# Altium PCB Karta_ILS.PCBDOC (part 8 of 9)
Units mm, origin at the board's own origin, x right, y up, seen from the top; angles counter-clockwise.
Board outline 70 x 83.2 mm, 6 copper layers (TopLayer, Layer 1, Layer 2, Layer 3, Layer 4, Bottom Layer), stack 0.914 mm thick; 406 components, 271 nets, 1327 pads, 719 vias.
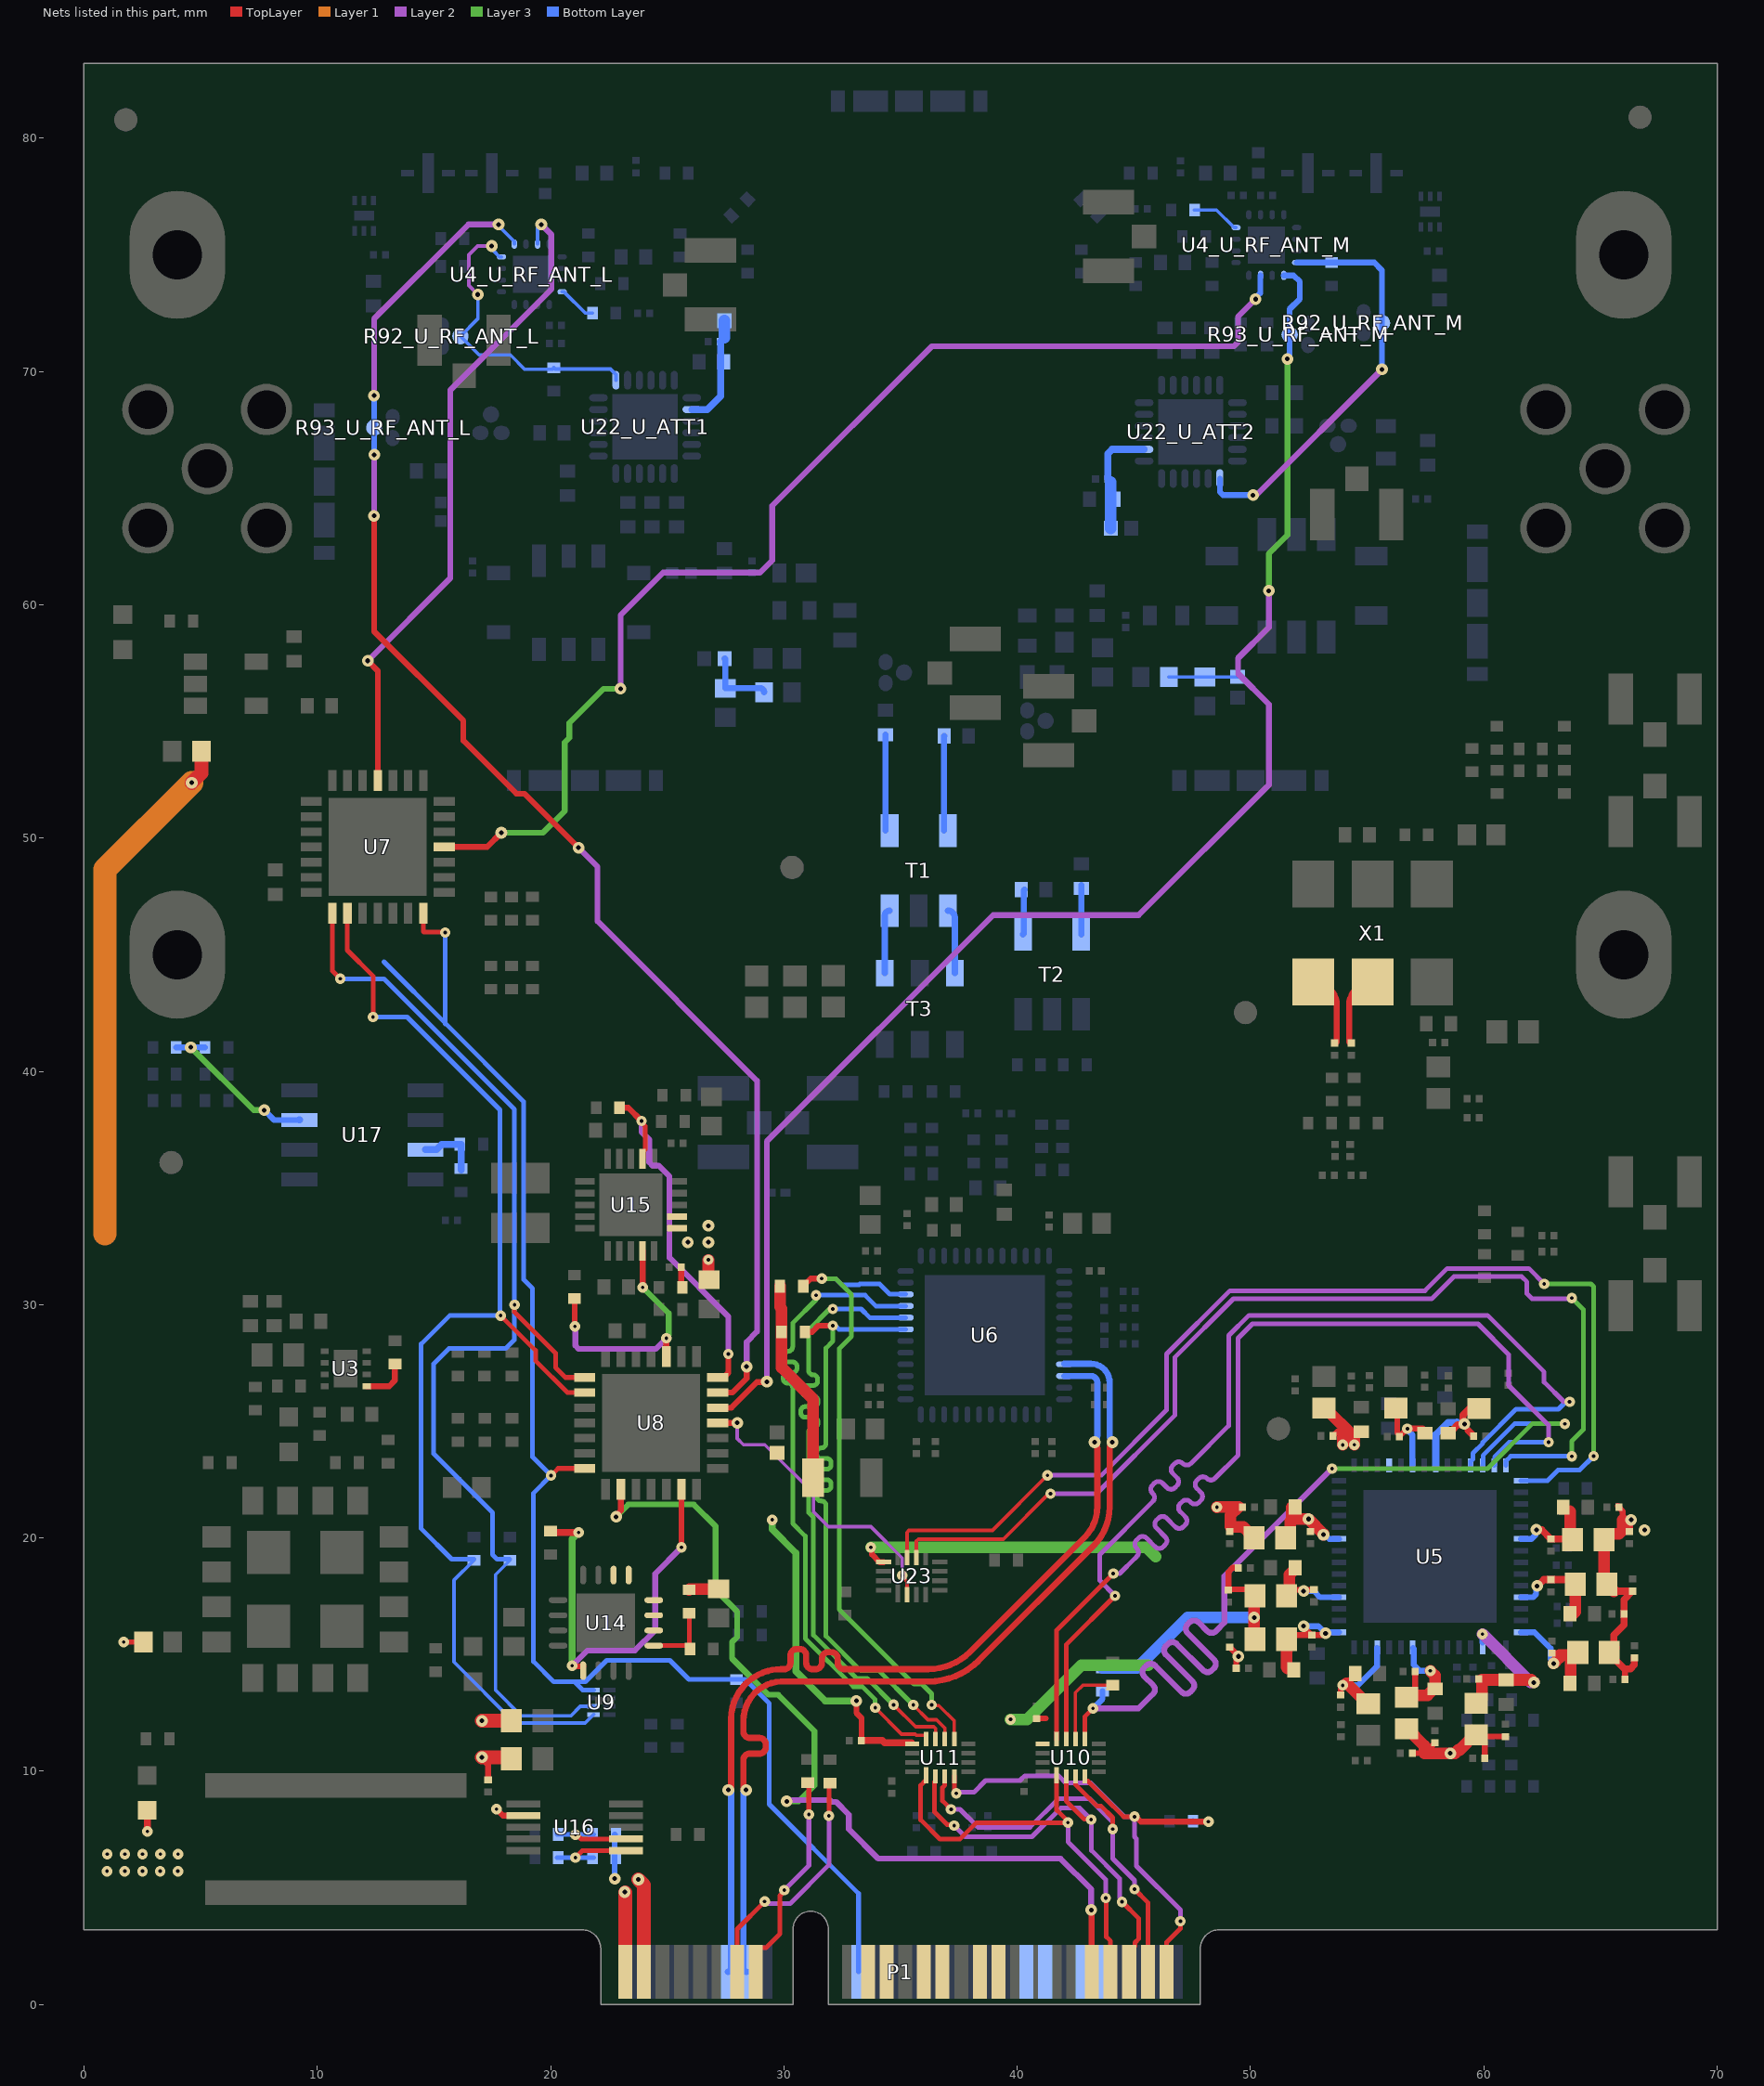
[diagram p9: the nets of this part, all layers, seen from the top]

## Via types
v1: diameter 0.5, hole 0.2, TopLayer to Bottom Layer, tented both sides, 456 vias
v2: diameter 0.45, hole 0.15, TopLayer to Bottom Layer, tented both sides, 237 vias
v3: diameter 0.45, hole 0.15, TopLayer to Bottom Layer, 23 vias
v4: diameter 0.5, hole 0.2, TopLayer to Bottom Layer, 3 vias

## Nets (pads, with @x,y where several pads share a name; then routed paths per layer and width w, separated by ;. In a path a pad name is that pad's centre, name@x,y a point inside that pad or via, vN(x,y) a via of type N, cw(c..) or ccw(c..) an arc to the next point about the centre after c; other vN are vias at no path point) (continued)
NetR90_U_RF_ANT_L_2: R90_U_RF_ANT_L.2 U4_U_RF_ANT_L.4 | length 1.7
  Bottom Layer w0.15: U4_U_RF_ANT_L.4@20.494,73.414 20.579,73.414 21.493,72.5 R90_U_RF_ANT_L.2@21.794,72.5
NetR90_U_RF_ANT_M_2: R90_U_RF_ANT_M.2 U4_U_RF_ANT_M.4 | length 2.1
  Bottom Layer w0.15: R90_U_RF_ANT_M.2@47.6,76.919 48.543,76.919 49.293,76.169 U4_U_RF_ANT_M.4@49.378,76.169
NetR98_1: R98.1 R99.2 U14.9 | length 3.1
  TopLayer w0.2: U14.9@24.423,15.384 R99.2@25.883,15.384 ; R98.1@25.942,16.826 25.942,15.325 R99.2@26.025,15.242
NetR108_1: R108.1 R110.2 U16.2 | length 3.8
  TopLayer w0.2: v2(21.064,7.285) 21.118,7.285 21.309,7.094 U16.2@23.227,7.094
  Bottom Layer w0.2: R110.2@20.275,7.285 v2(21.064,7.285) R108.1@21.853,7.285
NetR109_1: R109.1 R111.2 U16.1 | length 3.9
  TopLayer w0.2: v2(21.062,6.294) 21.362,6.594 U16.1@23.227,6.594
  Bottom Layer w0.2: R111.2@20.28,6.294 v2(21.062,6.294) R109.1@21.844,6.294
NetR112_1: R112.1 R115.2 U17.7 | length 2.7
  Bottom Layer w0.3: U17.7@14.637,36.644 15.112,36.644 15.34,36.872 16.161,36.872 R112.1@16.161,35.78
NetR113_1: R113.1 R114.2 U17.3 | length 7.2
  Layer 3 w0.25: v1(4.579,41.029) 7.274,38.335 v1(7.729,38.335)
  Bottom Layer w0.25: R114.2@3.954,41.029 v1(4.579,41.029) R113.1@5.19,41.029 ; v1(7.729,38.335) 8.15,37.914 U17.3@9.237,37.914
  Bottom Layer w0.3: U17.3@9.228,37.922 U17.3@9.237,37.914
NetR123_2: R123.2 U3.5 | length 2
  TopLayer w0.25: U3.5@12.116,26.507 13.081,26.507 13.326,26.752 R123.2@13.326,27.452
NetT1_1: T1.1 T3.6 | length 2.8
  Bottom Layer w0.268: T3.6@34.327,44.208 34.327,46.683 cw(c34.533,46.683) T1.1@34.533,46.888
NetT1_3: T1.3 T3.4 | length 2.8
  Bottom Layer w0.268: T1.3@37.033,46.888 cw(c37.033,46.594) 37.327,46.594 T3.4@37.327,44.208
PER0_N: P1.21
PER0_P: P1.19
PER1_N: P1.27
PER1_P: P1.25
PER2_N: P1.33
PER2_P: P1.31
PERST2#: P1.43 U8.16 | length 39.5
  TopLayer w0.25: v1(22.809,20.906) 22.809,20.974 23.01,21.175 U8.16@23.01,22.079 ; v1(43.17,4.054) 43.185,4.039 43.185,1.415 P1.43@43.2,1.4
  Layer 2 w0.25: v1(30.124,8.712) 30.171,8.759 31.975,8.759 32.051,8.684 32.24,8.684 32.785,8.139 32.785,7.515 34.046,6.254 41.863,6.254 43.17,4.946 v1(43.17,4.054)
  Layer 3 w0.25: v1(22.809,20.906) 23.337,21.434 26.144,21.434 27.075,20.502 27.075,17.766 28,16.841 28,15.761 27.777,15.538 27.777,14.833 29.333,13.277 29.756,13.277 31.311,11.721 31.311,9.39 30.792,8.87 30.634,8.712 v1(30.124,8.712)
PERST#: P1.18 R1.2 U7.14 U8.14 U9.8 | length 66.1
  TopLayer w0.2: U7.14@14.552,46.735 14.552,45.985 14.569,45.969 15.461,45.969 v2(15.481,45.949) ; v2(20.022,22.676) 20.326,22.979 U8.14@21.46,22.979
  Bottom Layer w0.2: 12.854,44.697 15.496,42.055 18.849,38.702 18.849,31.076 19.227,30.698 19.227,23.472 v2(20.022,22.676) 19.27,21.923 19.27,17.637 19.27,14.699 20.133,13.836 21.027,13.836 ; 15.481,42.04 v2(15.481,45.949) ; U9.8@21.844,13.481 21.381,13.481 21.027,13.836 ; P1.18@33.2,1.4 33.2,4.757 29.372,8.585 29.372,12.91 28.346,13.935 27.966,13.935 25.93,13.935 25.109,14.756 22.41,14.756 21.49,13.836 21.027,13.836
PET2_N: P1.38
PET2_P: P1.36
PET3_N: P1.44
PET3_P: P1.42
PG_LMK_1V8: R105.1 U8.3 U15.9 | length 11.2
  TopLayer w0.25: R105.1@21.033,30.253 21.033,29.078 v2(21.044,29.068) ; U15.9@23.945,32.304 23.949,32.301 23.949,30.744 v2(23.952,30.74) ; U8.3@24.96,27.779 v2(24.96,28.559)
  Layer 2 w0.25: v2(21.044,29.068) 21.059,29.052 21.059,28.246 21.206,28.099 24.501,28.099 v2(24.96,28.559)
  Layer 3 w0.25: v2(23.952,30.74) 25.06,29.632 25.06,28.713 24.96,28.613 v2(24.96,28.559)
PG_LMK_3V3: R104.1 U8.28 U15.17 | length 15.9
  TopLayer w0.2: v2(23.898,37.874) 23.898,37.806 24.059,37.645 24.059,36.786 24.051,36.779 24.051,36.645 23.985,36.579 23.985,36.294 U15.17@23.945,36.254
  TopLayer w0.25: R104.1@22.96,38.442 23.33,38.442 v2(23.898,37.874) ; U8.28@27.16,26.879 27.425,26.879 27.62,27.074 v2(27.62,27.883)
  Layer 2 w0.25: v2(23.898,37.874) 23.898,37.401 24.224,37.075 24.224,36.106 24.371,35.959 24.637,35.959 25.096,35.5 25.096,32.009 27.62,29.485 v2(27.62,27.883)
PG_LTC2122: R97.1 U8.20 U14.5 | length 18.2
  TopLayer w0.25: v2(20.923,14.52) 20.952,14.492 U14.5@21.398,14.492 ; v2(25.61,19.594) U8.20@25.61,22.079
  TopLayer w0.3: R97.1@19.993,20.291 20.047,20.237 21.201,20.237 v2(21.205,20.233)
  Layer 2 w0.25: v2(20.923,14.52) 21.576,15.174 23.613,15.174 24.481,16.042 24.481,18.465 v2(25.61,19.594)
  Layer 3 w0.3: v2(20.923,14.52) 20.923,19.951 v2(21.205,20.233)
PGND: C1.1 C3.1 C153.1 D11.2 FB30.1 FB31.1 P1.1 P1.3 R108.2 R109.2 U16.7 | length 38.5
  TopLayer w0.2: v2(1.702,15.538) C1.1@2.55,15.538 C1.1@2.606,15.538
  TopLayer w0.25: v1(17.061,10.597) 17.061,10.529 17.323,10.267 C153.1@17.323,9.627 ; v2(17.681,8.375) 17.961,8.094 U16.7@18.827,8.094
  TopLayer w0.3: v2(2.715,7.421) D11.2@2.715,8.325 ; P1.3@24.072,1.4 P1.3@24.086,1.414
  TopLayer w0.5: v1(23.18,4.823) v1@23.2,4.803
  TopLayer w0.6: v1(4.619,52.368) 5.033,52.782 C3.1@5.033,53.721 ; v1(17.061,10.597) 18.264,10.597 FB30.1@18.325,10.536 ; v1(17.061,12.164) 17.064,12.167 FB31.1@18.325,12.167 ; P1.1@23.2,1.4 v1@23.2,4.803 ; v1(23.764,5.361) 24,5.125 P1.3@24,1.4
  Layer 1 w1: 0.9,33.041 0.9,48.649 v1(4.619,52.368)
  Bottom Layer w0.25: v1(22.753,5.397) 22.749,5.401 22.749,6.29 22.744,6.294 22.749,6.299 22.749,7.28 R108.2@22.753,7.285
  other v2: 0.991,5.715 1.75,5.715 2.508,5.715 3.267,5.715 4.026,5.715 0.996,6.444 1.755,6.444 2.513,6.444 3.272,6.444 4.031,6.444
Q\_U_RF_ANT_L: R91_U_ATT1.1 R92_U_RF_ANT_L.3 U4_U_RF_ANT_L.12 U22_U_ATT1.19 | length 13.4
  Layer 2 w0.15: v1(16.881,73.299) 16.496,73.683 16.496,75 16.875,75.379 v1(17.481,75.379)
  Bottom Layer w0.15: v1(16.881,73.299) 16.881,72.254 R92_U_RF_ANT_L.3@16.137,71.511 16.937,70.711 18.276,70.711 18.896,70.091 20.067,70.091 R91_U_ATT1.1@20.136,70.161 20.195,70.101 22.572,70.101 22.802,69.871 U22_U_ATT1.19@22.802,69.621 ; v1(17.481,75.379) 17.548,75.312 17.548,75.175 17.809,74.914 U4_U_RF_ANT_L.12@17.894,74.914
Q\_U_RF_ANT_M: R91_U_ATT2.1 R92_U_RF_ANT_M.3 U4_U_RF_ANT_M.12 U22_U_ATT2.19 | length 17.9
  Layer 2 w0.25: v1(50.109,64.702) 50.248,64.702 v1(55.633,70.087)
  Bottom Layer w0.25: U22_U_ATT2.19@48.688,65.412 48.688,64.835 48.821,64.702 v1(50.109,64.702) ; U4_U_RF_ANT_M.12@51.978,74.669 R91_U_ATT2.1@53.478,74.669 55.307,74.669 55.636,74.34 R92_U_RF_ANT_M.3@55.636,72.088 55.633,72.086 v1(55.633,70.087)
Q_U_RF_ANT_L: R93_U_RF_ANT_L.3 U4_U_RF_ANT_L.13 U8.27 | length 62.2
  TopLayer w0.25: v1(12.437,63.81) 12.437,58.851 16.262,55.026 16.262,54.171 18.531,51.902 18.883,51.902 v1(21.2,49.585) ; U8.27@27.16,26.229 27.785,26.229 28.401,26.845 v1(28.401,27.341)
  Layer 2 w0.25: v1(12.437,63.81) 12.439,63.812 12.439,66.429 v1(12.441,66.431) ; v1(12.437,68.968) 12.437,72.256 16.481,76.3 v1(17.769,76.3) ; v1(21.2,49.585) 22.011,48.774 22.011,46.439 28.85,39.601 28.85,28.848 28.401,28.399 v1(28.401,27.341)
  Bottom Layer w0.15: v1(17.769,76.3) 17.769,76.245 18.444,75.57 U4_U_RF_ANT_L.13@18.444,75.464
  Bottom Layer w0.25: v1(12.437,68.968) 12.439,68.966 12.439,67.596 R93_U_RF_ANT_L.3@12.441,67.593 v1(12.441,66.431)
Q_U_RF_ANT_M: R93_U_RF_ANT_M.3 U4_U_RF_ANT_M.13 U8.26 | length 64.7
  TopLayer w0.25: U8.26@27.16,25.579 27.745,25.579 28.845,26.679 29.249,26.679 v1(29.27,26.699)
  Layer 2 w0.25: v1(29.27,26.699) 29.27,37 38.97,46.7 45.206,46.7 50.784,52.278 50.784,55.735 49.465,57.054 49.465,57.71 50.784,59.029 v1(50.784,60.6)
  Layer 3 w0.25: v1(50.784,60.6) 50.784,62.188 51.583,62.987 v1(51.583,70.538)
  Bottom Layer w0.25: U4_U_RF_ANT_M.13@51.428,74.119 51.846,74.119 52.115,73.85 52.115,73.11 51.676,72.671 R93_U_RF_ANT_M.3@51.676,71.588 51.676,70.699 51.583,70.606 v1(51.583,70.538)
ResetN_1V8: U5.15 U23.11 | length 47.7
  TopLayer w0.15: U23.11@35.277,19.164 35.277,20.233 35.365,20.321 38.935,20.321 v2(41.3,22.685)
  Layer 2 w0.2: v2(41.3,22.685) 43.609,22.685 46.406,25.482 46.406,27.883 49.121,30.598 57.478,30.598 58.431,31.552 61.927,31.552 v2(62.586,30.892)
  Layer 3 w0.2: v2(62.586,30.892) 64.587,30.892 64.704,30.775 v2(64.704,23.506)
  Bottom Layer w0.2: U5.15@61.593,22.456 62.732,22.456 63.182,22.906 64.104,22.906 v2(64.704,23.506)
ResetN_3V3: U8.25 U23.2 | length 12.8
  TopLayer w0.15: v2(35.07,18.392) 35.07,18.339 35.277,18.132 U23.2@35.277,17.564
  TopLayer w0.25: U8.25@27.16,24.929 v1@28,24.93
  Layer 2 w0.15: v1(28,24.93) 28,24.26 28.264,23.996 29.182,23.996 31.267,21.91 31.267,21.124 31.908,20.484 33.725,20.484 35.07,19.139 v2(35.07,18.392)
RST_RF_P_1: U4_U_RF_ANT_L.15 U7.25 | length 28.3
  TopLayer w0.25: v1(12.165,57.6) 12.594,57.172 U7.25@12.594,52.47
  Layer 2 w0.25: v1(12.165,57.6) 15.7,61.135 15.7,69.2 20.025,73.525 20.025,75.875 v1(19.6,76.3)
  Bottom Layer w0.15: U4_U_RF_ANT_L.15@19.444,75.464 19.444,76.144 v1(19.6,76.3)
RST_RF_P_2: U4_U_RF_ANT_M.15 U7.18 | length 51.6
  TopLayer w0.25: U7.18@15.443,49.62 17.282,49.62 v1(17.889,50.227)
  Layer 2 w0.25: v1(23,56.4) 23,59.555 24.821,61.376 28.976,61.376 29.5,61.9 29.5,64.243 36.335,71.078 49.285,71.078 49.463,71.256 49.463,72.35 v1(50.213,73.1)
  Layer 3 w0.25: v1(17.889,50.227) 19.674,50.227 20.607,51.16 20.607,54.094 20.81,54.297 20.81,54.932 22.277,56.4 v1(23,56.4)
  Bottom Layer w0.25: v1(50.213,73.1) 50.213,73.148 50.418,73.353 50.418,74.109 U4_U_RF_ANT_M.15@50.428,74.119
SCK: R11.2 U7.8 U8.8 U9.6 | length 52.1
  TopLayer w0.2: U7.8@10.644,46.77 10.644,44.307 v2(10.983,43.967) ; v2(18.456,29.99) 18.456,29.674 20.209,27.921 20.209,27.306 20.635,26.879 U8.8@21.46,26.879
  Bottom Layer w0.15: R11.2@18.257,19.089 R11.2@18.257,19.039 17.642,18.423 17.642,13.473 18.744,12.371 20.865,12.371 21.276,12.781 U9.6@21.844,12.781
  Bottom Layer w0.2: v2(10.983,43.967) 12.852,43.967 18.446,38.374 18.446,28.491 18.069,28.115 15.638,28.115 14.991,27.468 14.991,23.605 17.511,21.085 17.511,19.284 17.706,19.089 R11.2@18.257,19.089
SDA: R10.2 U7.9 U8.9 U9.5 | length 52.6
  TopLayer w0.2: U7.9@11.294,46.77 11.29,46.766 11.29,45.542 11.286,45.538 11.286,45.194 12.391,44.089 v2(12.391,42.331) ; v2(17.861,29.531) 19.357,28.035 19.357,27.592 20.72,26.229 U8.9@21.46,26.229
  Bottom Layer w0.15: R10.2@16.711,19.089 R10.2@16.711,19.039 15.861,18.189 15.861,14.683 18.473,12.071 21.483,12.071 U9.5@21.844,12.431
  Bottom Layer w0.2: v2(12.391,42.331) 13.855,42.331 17.833,38.353 17.833,29.559 v2(17.861,29.531) 15.675,29.531 14.456,28.312 14.456,20.394 15.762,19.089 R10.2@16.711,19.089
SMCLK: P1.15 R71.1 | length 9.3
  TopLayer w0.2: P1.15@28.8,1.4 28.8,2.237 29,2.437 29.237,2.437 29.828,3.027 29.828,4.662 30.021,4.856 v2(30.021,4.904) ; R71.1@31.025,9.554 31.072,9.507 v3(31.072,8.149)
  Layer 2 w0.2: v2(30.021,4.904) 31.072,5.955 v3(31.072,8.149)
SMDAT: P1.13 R70.1 | length 10.5
  TopLayer w0.2: P1.13@28,1.4 28,3.236 v2(29.177,4.412) ; v3(31.924,8.087) 31.924,8.099 31.928,8.103 R70.1@31.928,9.48
  Layer 2 w0.2: v2(29.177,4.412) 29.27,4.319 30.263,4.319 31.928,5.984 31.928,8.083 v3(31.924,8.087)
SPI_1V8_ADC: C15.1 C75.2 FB6.1 FB7.1 R14.2 R15.2 R98.2 U11.13 U14.10 U14.11 U14.12 U14.13 U14.14 | length 24.1
  TopLayer w0.25: v1(33.109,13.017) 33.109,12.504 33.327,12.286 33.327,11.321 C15.1@33.327,11.319
  TopLayer w0.3: C15.1@33.327,11.321 34.206,11.321 34.309,11.218 U11.13@35.461,11.218
  TopLayer w0.5: R98.2@25.942,17.776 25.964,17.798 27.181,17.798 C75.2@27.203,17.821 ; R15.2@29.831,30.789 29.831,29.9 29.899,29.832 R14.2@29.899,28.832 29.899,27.3 31.25,25.949 FB7.1@31.25,22.585
  Layer 3 w0.3: v3@29.5,20.808 29.5,20.364 30.516,19.348 30.516,14.279 31.778,13.017 v1(33.109,13.017)
  other v3: 29.499,20.777
SPI_1V8_CLK: C71.1 C113.2 C114.2 C117.2 C118.2 C121.2 C122.2 C125.2 C126.2 C131.2 C132.2 C135.2 C136.2 C141.2 C142.2 C143.2 C144.2 C147.2 C148.2 FB13.1 FB14.1 FB16.1 FB17.1 FB18.1 FB19.1 FB20.1 FB21.1 R12.2 R102.2 U10.13 U15.11 U15.12 U23.13 | length 56.7
  TopLayer w0.25: R102.2@25.596,30.74 25.601,30.745 25.601,31.591 C142.2@25.606,31.596 ; v2(33.732,19.594) 33.77,19.556 33.77,19.296 34.102,18.964 U23.13@34.277,18.964 ; C71.1@40.84,12.264 41.23,12.264 ; C125.2@49.053,17.77 49.053,18.543 49.227,18.718 C126.2@49.479,18.718 ; C118.2@49.099,15.316 49.109,15.316 49.485,14.94 v1(49.485,14.921) ; C125.2@49.14,17.796 49.915,17.796 FB17.1@50.197,17.514 ; C117.2@49.387,14.414 49.387,14.733 49.495,14.841 v1@49.495,14.93 ; C148.2@56.944,10.769 57.453,10.769 C147.2@57.909,11.225 ; FB13.1@59.798,11.488 C113.2@60.93,11.488 ; FB13.1@59.799,11.479 60.037,11.24 C114.2@60.037,10.557 ; C121.2@65.739,21.367 C121.2@65.849,21.257 ; C121.2@65.823,21.275 65.955,21.143 65.955,20.777 ; 66.033,14.384 66.048,14.369 C144.2@66.048,13.932 ; C122.2@66.24,20.269 66.265,20.294 66.265,20.729 v1(66.313,20.777)
  TopLayer w0.3: FB20.1@65.379,15.038 66.033,14.384 66.281,14.384 66.457,14.56 C143.2@66.457,14.853 ; FB18.1@65.571,17.717 C132.2@66.373,17.717 66.009,17.354 C131.2@66.009,16.751 66.009,16.271 65.579,15.841 FB20.1@65.579,15.288
  TopLayer w0.5: v3(26.764,31.921) 26.764,31.089 C141.2@26.788,31.065 ; v2(48.561,21.319) 48.563,21.321 49.486,21.321 49.137,20.972 49.137,20.494 49.159,20.472 49.687,20.472 49.9,20.259 49.95,20.259 50.15,20.059 FB19.1@50.15,20.009 ; FB14.1@50.197,15.657 50.161,15.693 v1(50.161,16.586) 50.161,17.478 FB17.1@50.197,17.514 ; FB21.1@56.684,11.817 56.734,11.817 57.453,11.098 57.453,10.769 58.765,10.769 58.907,10.912 58.967,10.912 59.621,11.565 FB13.1@59.671,11.565 ; FB20.1@65.379,15.038 FB20.1@65.379,15.088 FB20.1@65.579,15.288 ; FB18.1@65.571,17.717 65.524,17.764 65.474,17.764 65.274,17.964 FB18.1@65.274,18.014 65.156,18.132 FB16.1@65.156,19.928 65.156,19.978 65.356,20.178 65.794,20.178 65.955,20.34 65.955,20.777
  Layer 3 w0.5: v2(33.732,19.594) 45.543,19.594 45.931,19.206 ; v3(39.717,12.222) 40.425,12.222 42.754,14.55 45.61,14.55 45.615,14.545
  Bottom Layer w0.5: R12.2@43.658,14.429 45.143,14.429 47.3,16.586 v1(50.161,16.586)
  other v1: 58.561,10.769 66.89,20.338 25.883,32.673 26.764,32.673 26.764,33.382
SPI_CLK_LMK: U5.13 U10.12 | length 44.8
  TopLayer w0.2: U10.12@41.695,11.379 41.695,16.048 v3(44.119,18.471)
  Layer 2 w0.2: v3(44.119,18.471) 44.394,18.471 45.059,19.135 45.13,19.206 ccw(c44.958,19.378) 45.13,19.549 45.114,19.565 cw(c45.286,19.736) 45.114,19.908 45.2,19.993 cw(c45.372,19.822) 45.543,19.993 45.917,19.62 ccw(c46.088,19.791) 46.26,19.62 46.346,19.705 ccw(c46.174,19.877) 46.346,20.048 45.972,20.422 cw(c46.143,20.594) 45.972,20.765 46.058,20.851 cw(c46.229,20.679) 46.401,20.851 46.774,20.477 ccw(c46.946,20.649) 47.117,20.477 47.203,20.563 ccw(c47.032,20.734) 47.203,20.906 46.985,21.124 cw(c47.157,21.296) 46.985,21.467 47.071,21.553 cw(c47.242,21.381) 47.414,21.553 47.445,21.522 ccw(c47.617,21.693) 47.788,21.522 47.874,21.607 ccw(c47.702,21.779) 47.874,21.95 47.702,22.122 cw(c47.874,22.293) 47.702,22.465 47.788,22.551 cw(c47.96,22.379) 48.131,22.551 ccw(c48.303,22.722) 48.474,22.551 49.463,23.54 49.463,28.558 50.079,29.174 59.753,29.174 61.069,27.858 61.069,26.53 62.775,24.824 v3(62.775,24.103)
  Bottom Layer w0.2: U5.13@60.443,23.106 60.463,23.126 60.463,23.47 61.095,24.103 v3(62.775,24.103)
SPI_CLK_LTC: U6.45 U11.12 | length 27.9
  TopLayer w0.15: v3(33.914,12.721) 35.042,11.593 35.616,11.593 35.668,11.542 36.1,11.542 U11.12@36.1,11.379
  Layer 3 w0.2: 30.176,27.995 ccw(c30.176,27.814) 29.994,27.814 29.994,27.723 ccw(c30.176,27.723) 30.176,27.541 30.376,27.541 cw(c30.376,27.36) 30.557,27.36 30.557,27.269 cw(c30.376,27.269) 30.376,27.087 30.158,27.087 ccw(c30.158,26.906) 29.977,26.906 29.977,26.815 ccw(c30.158,26.815) 30.158,26.633 30.176,26.633 cw(c30.176,26.433) 30.376,26.433 30.376,25.425 30.376,20.622 30.918,20.08 30.918,15.687 32.977,13.627 33.361,13.627 33.914,13.074 v3(33.914,12.721) ; 30.176,27.995 ccw(c30.176,28.195) 30.376,28.195 30.376,28.981 30.376,29.207 31.382,30.214 v2(31.382,30.403)
  Bottom Layer w0.2: v2(31.382,30.403) 33.481,30.403 33.942,29.942 U6.45@35.217,29.942
SPI_CLK_MB: P1.45 U10.1 U11.1 | length 18.4
  TopLayer w0.2: U11.1@36.1,9.829 36.1,9.579 36.05,9.579 35.863,9.392 35.863,7.915 36.694,7.083 37.541,7.083 38.256,7.798 v3(42.176,7.798) 42.176,7.855 41.695,8.336 U10.1@41.695,9.829 ; v2(43.797,4.566) 43.822,4.54 43.822,2.898 44,2.721 P1.45@44,1.4
  Layer 2 w0.2: v3(42.176,7.798) 42.176,6.974 43.797,5.353 v2(43.797,4.566)
SPI_CS_LMK: R12.1 U5.12 U10.9 | length 42.6
  TopLayer w0.2: U10.9@42.895,11.379 42.895,12.334 v2(43.251,12.69)
  Layer 2 w0.25: v2(43.251,12.69) 45.204,12.69 45.739,13.225 45.827,13.313 ccw(c45.642,13.499) 45.827,13.684 45.445,14.067 cw(c45.631,14.252) 45.445,14.438 45.538,14.531 cw(c45.724,14.345) 45.909,14.531 47.045,13.395 ccw(c47.231,13.581) 47.416,13.395 47.509,13.488 ccw(c47.324,13.674) 47.509,13.859 46.373,14.995 cw(c46.559,15.181) 46.373,15.366 46.466,15.459 cw(c46.652,15.273) 46.838,15.459 47.973,14.323 ccw(c48.159,14.509) 48.345,14.323 48.437,14.416 ccw(c48.252,14.602) 48.437,14.787 47.302,15.923 cw(c47.487,16.109) 47.302,16.295 47.395,16.387 cw(c47.58,16.202) 47.766,16.387 48.148,16.005 ccw(c48.334,16.191) 48.519,16.005 48.88,16.366 48.88,18.36 v2(53.493,22.972)
  Layer 3 w0.2: v2(53.493,22.972) 60.157,22.972 62.077,24.892 v3(63.475,24.892)
  Bottom Layer w0.2: U5.12@59.943,23.106 59.963,23.126 59.963,23.536 61.318,24.892 v3(63.475,24.892)
  Bottom Layer w0.25: v2(43.251,12.69) 43.658,13.097 R12.1@43.658,13.429
SPI_CS_LTC: R15.1 U6.46 U11.9 | length 28.1
  TopLayer w0.15: v3(36.333,12.84) 36.357,12.816 36.646,12.816 37.3,12.161 U11.9@37.3,11.379
  TopLayer w0.2: R15.1@30.831,30.789 R15.1@30.933,30.892
  TopLayer w0.25: R15.1@30.933,30.892 31.155,31.113 v2(31.623,31.113)
  Layer 3 w0.2: v2(31.623,31.113) 32.214,31.113 32.9,30.427 32.9,28.64 32.374,28.114 32.374,16.933 35.569,13.738 35.913,13.738 36.333,13.317 v3(36.333,12.84)
  Bottom Layer w0.2: v2(31.623,31.113) 32.214,31.113 32.47,30.857 33.224,30.857 33.247,30.881 34.108,30.881 34.537,30.452 35.208,30.452 U6.46@35.217,30.442
SPI_MISO_LMK: R18.1 U10.10 | length 3.7
  TopLayer w0.15: U10.10@42.495,11.379 42.495,13.371 42.815,13.69 R18.1@44.096,13.69
SPI_MISO_LTC: R14.1 U6.43 U11.10 | length 27.5
  TopLayer w0.15: v3(35.547,12.844) 35.547,12.834 36.177,12.204 36.545,12.204 36.9,11.849 U11.10@36.9,11.379
  TopLayer w0.25: R14.1@30.899,28.832 31.211,28.832 31.479,29.1 v2(32.1,29.1)
  Layer 3 w0.2: v2(32.1,29.1) 32.1,28.432 31.803,28.135 31.803,24.057 cw(c31.603,24.057) 31.603,23.857 31.59,23.857 ccw(c31.59,23.675) 31.408,23.675 31.408,23.584 ccw(c31.59,23.584) 31.59,23.403 31.843,23.403 cw(c31.843,23.221) 32.024,23.221 32.024,23.13 cw(c31.843,23.13) 31.843,22.949 31.59,22.949 ccw(c31.59,22.767) 31.408,22.767 31.408,22.676 ccw(c31.59,22.676) 31.59,22.495 31.843,22.495 cw(c31.843,22.313) 32.024,22.313 32.024,22.222 cw(c31.843,22.222) 31.843,22.041 31.59,22.041 ccw(c31.59,21.859) 31.408,21.859 31.408,21.768 ccw(c31.59,21.768) 31.59,21.587 31.603,21.587 cw(c31.603,21.387) 31.803,21.387 31.803,21.287 31.803,15.792 33.267,14.327 34.052,14.327 35.535,12.844 v3(35.547,12.844)
  Bottom Layer w0.2: v2(32.1,29.1) 32.1,29.129 32.137,29.166 32.361,28.942 U6.43@35.217,28.942
SPI_MISO_MB: P1.49 U10.3 U11.3 | length 19.9
  TopLayer w0.2: U11.3@36.9,9.779 36.9,9.392 36.8,9.292 36.8,8.731 v2(37.165,8.366) ; U10.3@42.495,9.779 42.495,9.425 43.411,8.51 43.591,8.51 44.096,8.006 v3(44.096,7.517) ; v2(45.027,4.946) 45.6,4.373 P1.49@45.6,1.4
  Layer 2 w0.2: v2(37.165,8.366) 37.55,8.366 38.321,7.594 40.544,7.594 41.776,8.826 43.099,8.826 44.096,7.829 v3(44.096,7.517) 44.096,6.254 45.027,5.323 v2(45.027,4.946)
SPI_MOSI_LMK: U5.11 U10.11 | length 44.8
  TopLayer w0.2: U10.11@42.095,11.379 42.095,15.419 v3(44.196,17.519)
  Layer 2 w0.2: v3(44.196,17.519) 43.534,18.182 43.534,19.283 45.741,21.491 45.812,21.562 ccw(c45.641,21.733) 45.812,21.905 45.797,21.92 cw(c45.968,22.092) 45.797,22.263 45.882,22.349 cw(c46.054,22.178) 46.226,22.349 46.42,22.155 ccw(c46.592,22.326) 46.763,22.155 46.849,22.24 ccw(c46.677,22.412) 46.849,22.583 46.67,22.763 cw(c46.841,22.934) 46.67,23.106 46.755,23.191 cw(c46.927,23.02) 47.098,23.191 ccw(c47.27,23.363) 47.442,23.191 49.059,24.809 49.07,24.819 49.07,28.677 49.937,29.544 60.157,29.544 62.586,27.115 62.586,26.68 63.435,25.832 v3(63.678,25.832)
  Bottom Layer w0.2: U5.11@59.443,23.106 59.443,23.286 59.529,23.373 59.529,23.627 59.96,24.058 59.96,24.099 61.38,25.519 63.198,25.519 63.511,25.832 v3(63.678,25.832)
SPI_MOSI_LTC: U6.44 U11.11 | length 27.8
  TopLayer w0.15: v3(34.705,12.846) 35.647,11.904 36.42,11.904 36.5,11.824 U11.11@36.5,11.379
  Layer 3 w0.2: v2(32.099,29.817) 31.961,29.817 31.058,28.915 31.058,28.426 31.058,27.189 ccw(c31.258,27.189) 31.258,26.989 cw(c31.258,26.807) 31.44,26.807 31.44,26.716 cw(c31.258,26.716) 31.258,26.535 30.982,26.535 ccw(c30.982,26.353) 30.8,26.353 30.8,26.262 ccw(c30.982,26.262) 30.982,26.081 31.271,26.081 cw(c31.271,25.899) 31.453,25.899 31.453,25.808 cw(c31.271,25.808) 31.271,25.627 30.907,25.627 ccw(c30.907,25.445) 30.726,25.445 30.726,25.354 ccw(c30.907,25.354) 30.907,25.173 31.271,25.173 cw(c31.271,24.991) 31.453,24.991 31.453,24.9 cw(c31.271,24.9) 31.271,24.719 31.258,24.719 ccw(c31.258,24.519) 31.058,24.519 31.058,23.965 31.058,21.087 31.268,20.877 31.268,15.832 33.122,13.977 33.574,13.977 v3(34.705,12.846)
  Bottom Layer w0.2: v2(32.099,29.817) 33.308,29.817 33.683,29.442 U6.44@35.217,29.442
SPI_MOSI_MB: P1.47 U10.2 U11.2 | length 19.4
  TopLayer w0.2: U11.2@36.5,9.779 36.5,9.579 36.45,9.529 36.45,8.254 36.987,7.716 37.251,7.716 v2(37.299,7.668) ; U10.2@42.095,9.779 42.095,8.728 42.873,7.95 43.148,7.95 v3(43.17,7.928) ; v2(44.494,4.402) 45.216,3.68 45.216,2.82 45.05,2.654 45.05,2.5 44.8,2.25 P1.47@44.8,1.4
  Layer 2 w0.2: v2(37.299,7.668) 37.776,7.191 40.636,7.191 41.864,8.419 42.679,8.419 v3(43.17,7.928) ; v3@43.183,7.928 43.183,6.601 44.384,5.4 44.384,4.566 44.494,4.456 v2(44.494,4.402)
SPI_nCS_1_MB: P1.51 R64.2 U10.4 U11.4 | length 23.9
  TopLayer w0.2: v2@37.3,9.173 U11.4@37.3,9.779 ; U10.4@42.895,9.779 42.895,9.579 43.031,9.579 43.75,8.86 ; 43.751,8.86 44.559,8.052 v3(45.027,8.052) ; P1.51@46.4,1.4 46.4,2.665 46.995,3.26 v2(46.995,3.569)
  TopLayer w0.25: v3(45.027,8.052) 45.081,8.052 45.298,7.835 v2(48.197,7.835)
  Layer 2 w0.2: v2(37.385,9.049) 37.433,9.097 38.144,9.097 38.643,9.597 40.117,9.597 40.326,9.806 41.776,9.806 42.083,9.499 43.152,9.499 44.599,8.052 v3(45.027,8.052) 45.027,7.191 45.11,7.107 45.11,5.939 46.995,4.054 v2(46.995,3.569)
  Bottom Layer w0.25: R64.2@47.532,7.858 47.544,7.846 48.185,7.846 v2(48.197,7.835)
Sync_04610: U5.14 U23.10 | length 45.9
  TopLayer w0.15: U23.10@35.677,19.164 35.677,19.861 35.765,19.949 39.407,19.949 41.349,21.892 v2(41.431,21.892)
  Layer 2 w0.2: v2(41.431,21.892) 43.396,21.892 46.756,25.252 46.756,27.738 49.266,30.248 57.767,30.248 58.72,31.202 61.621,31.202 61.847,30.976 61.847,30.469 62.068,30.248 63.741,30.248 v2(63.775,30.282)
  Layer 3 w0.2: v2(63.775,23.499) 63.775,24.151 64.263,24.639 64.263,29.795 v2(63.775,30.282)
  Bottom Layer w0.2: U5.14@60.943,23.106 60.943,23.286 61.156,23.499 v2(63.775,23.499)
SYNC_N: P1.12 U6.22 | length 40.3
  TopLayer w0.268: v1(27.62,9.195) ccw(c27.62,9.311) 27.736,9.311 27.736,12.231 cw(c29.878,12.231) 29.319,14.299 cw(c29.878,12.231) 29.878,14.373 30.012,14.373 ccw(c30.012,14.643) 30.282,14.643 30.282,14.966 cw(c30.552,14.966) 30.552,15.235 30.687,15.235 cw(c30.687,14.966) 30.956,14.966 30.956,14.643 ccw(c31.226,14.643) 31.226,14.373 31.361,14.373 ccw(c31.361,14.643) 31.631,14.643 31.631,14.834 cw(c31.901,14.834) 31.901,15.104 32.035,15.104 cw(c32.035,14.834) 32.305,14.834 32.305,14.643 ccw(c32.575,14.643) 32.575,14.373 33.665,14.373 36.181,14.373 ccw(c36.181,16.913) 37.977,15.117 42.895,20.035 ccw(c41.598,21.333) 43.433,21.333 43.433,23.842 ccw(c43.235,23.842) 43.375,23.982 v1@43.361,23.996 ; v1(43.317,24.103) ccw(c43.469,24.103) v1@43.361,23.996
  Bottom Layer w0.268: P1.12@27.6,1.4 ccw(c27.6,1.536) 27.736,1.536 27.736,9.079 ccw(c27.62,9.079) v1(27.62,9.195) ; U6.22@42.017,26.942 43.153,26.941 cw(c43.153,26.66) 43.433,26.66 43.433,24.383 cw(c43.189,24.383) 43.361,24.21 ccw(c43.469,24.103) v1(43.317,24.103)
SYNC_P: P1.14 U6.21 | length 40.3
  TopLayer w0.268: v1(28.38,9.195) cw(c28.38,9.311) 28.264,9.311 28.264,9.675 28.264,10.484 cw(c28.534,10.484) 28.534,10.753 28.954,10.753 ccw(c28.954,11.023) 29.224,11.023 29.224,11.158 ccw(c28.954,11.158) 28.954,11.428 28.534,11.428 cw(c28.534,11.698) 28.264,11.698 28.264,12.165 cw(c29.945,12.165) 29.887,13.845 36.185,13.845 ccw(c36.185,16.904) 38.348,14.741 43.272,19.665 ccw(c41.609,21.328) 43.961,21.328 43.961,23.842 cw(c44.159,23.842) 44.019,23.982 44.033,23.996 ccw(c43.925,24.103) v1(44.077,24.103)
  Bottom Layer w0.268: v1(28.38,9.195) ccw(c28.38,9.079) 28.264,9.079 28.264,1.536 ccw(c28.4,1.536) P1.14@28.4,1.4 ; U6.21@42.017,27.469 43.153,27.469 cw(c43.153,26.66) 43.961,26.66 43.961,24.383 ccw(c44.205,24.383) 44.033,24.21 cw(c43.925,24.103) v1(44.077,24.103)
TorRF_50Ohm_12_0: C175.1 T1.5 | length 4.1
  Bottom Layer w0.268: T1.5@34.358,50.318 C175.1@34.358,54.425
TorRF_50Ohm_12_1: C156.1 T1.4 | length 4.1
  Bottom Layer w0.268: T1.4@36.858,50.318 36.863,50.323 36.863,54.374 C156.1@36.867,54.374
TorRF_50Ohm_33_0: C164.2 T2.4 | length 2.1
  Bottom Layer w0.268: T2.4@42.748,45.873 C164.2@42.748,47.975
TorRF_50Ohm_33_1: C158.2 T2.5 | length 1.9
  Bottom Layer w0.268: T2.5@40.248,45.873 40.281,45.906 40.281,47.755 C158.2@40.314,47.788
Vcc_5V_AMP_1: C171.1 FB26.2 R126.2 | length 3
  Bottom Layer w0.268: FB26.2@27.459,57.691 cw(c27.459,57.659) 27.491,57.659 C171.1@27.491,56.424 28.979,56.424 cw(c28.979,56.252) R126.2@29.15,56.252
Vcc_5V_AMP_2: C161.1 FB27.2 R84.2 | length 3
  Bottom Layer w0.15: R84.2@46.498,56.906 C161.1@48.038,56.906 FB27.2@49.454,56.906
Vcc_5V_ATT_1: C180_U_ATT1.2 C181_U_ATT1.2 FB24.2 U22_U_ATT1.2 | length 4.8
  Bottom Layer w0.3: U22_U_ATT1.2@26.052,68.371 26.717,68.371 27.285,68.939 27.285,71.256 C180_U_ATT1.2@27.27,71.271 27.45,71.451
  Bottom Layer w0.5: 27.45,71.451 FB24.2@27.45,72.178
Vcc_5V_ATT_2: C180_U_ATT2.2 C181_U_ATT2.2 FB25.2 U22_U_ATT2.2 | length 4.7
  Bottom Layer w0.3: C180_U_ATT2.2@43.878,65.397 43.878,66.472 44.069,66.662 U22_U_ATT2.2@45.438,66.662
  Bottom Layer w0.5: FB25.2@44.008,63.272 44.008,64.55 C180_U_ATT2.2@44.008,65.267
VCXO_OUT_N: C43.2 X1.5 | length 3.2
  TopLayer w0.268: C43.2@54.323,41.215 cw(c54.323,41.31) 54.227,41.31 54.227,42.823 cw(c55.233,42.823) X1.5@55.233,43.829
VCXO_OUT_P: C40.2 X1.4 | length 3.2
  TopLayer w0.268: X1.4@52.693,43.829 cw(c52.693,42.823) 53.699,42.823 53.699,41.304 cw(c53.61,41.304) C40.2@53.61,41.215
VDD_CORE: C95.2 C96.2 FB8.2 U5.8 | length 4.4
  TopLayer w0.3: C96.2@58.473,24.615 58.648,24.615 58.876,24.843 59.133,24.843 v1(59.171,24.882) ; v1@59.104,24.921 59.104,25.263 59.404,25.563 FB8.2@59.454,25.563 ; 59.319,24.612 59.566,24.365 C95.2@59.566,24.355
  Bottom Layer w0.3: U5.8@57.943,23.106 57.943,24.426 58.472,24.956 58.828,24.956 58.848,24.976
VDD_IO: C115.2 C116.2 FB13.2 U5.31 | length 6.8
  TopLayer w0.5: FB13.2@59.671,12.915 59.721,12.915 59.921,13.115 59.921,13.915 62.033,13.915 v1(62.144,13.805)
  Layer 2 w0.5: v2(59.943,15.877) 62.015,13.805 v1(62.144,13.805)
  Bottom Layer w0.25: U5.31@59.943,15.521 v2(59.943,15.877)
VDD_OSC: C149.2 C150.2 FB21.2 U5.37 | length 5.1
  TopLayer w0.25: FB21.2@56.684,13.167 56.729,13.167 57.054,13.492 C149.2@57.054,14.273
  TopLayer w0.5: FB21.2@56.684,13.167 56.773,13.256 57.584,13.256 57.859,13.531 C150.2@57.909,13.531 57.909,14.1 v2(57.708,14.301)
  Bottom Layer w0.25: U5.37@56.97,15.279 56.995,15.254 56.995,14.565 57.259,14.301 v2(57.708,14.301)
VDD_PLL1: C99.2 C100.2 FB9.2 U5.40 | length 4.9
  TopLayer w0.25: C99.2@53.864,13.262 v2@53.864,13.538 ; v2(53.955,13.683) 53.993,13.721 54.071,13.721 54.121,13.772 54.49,14.14 C100.2@54.49,14.19
  TopLayer w0.5: v2@54.121,13.772 54.999,12.894 FB9.2@55.049,12.894
  Bottom Layer w0.25: v2(53.955,13.683) 54.609,13.683 55.424,14.498 U5.40@55.424,15.288
VDD_PLL2CORE: C103.2 C104.2 FB10.2 U5.6 | length 3.9
  TopLayer w0.25: FB10.2@56.234,25.563 56.292,25.505 56.292,24.504 ; C103.2@56.384,24.352 v2@56.722,24.69 ; v2@56.724,24.688 C104.2@57.383,24.688
  Bottom Layer w0.25: v2(56.724,24.682) 56.724,24.642 56.943,24.423 U5.6@56.943,23.106
VDD_PLL2OSC: C107.2 C108.2 FB11.2 U5.4 | length 3.2
  TopLayer w0.25: C107.2@53.536,24.372 53.536,24.382 53.561,24.407 53.571,24.407 53.717,24.553 54.212,24.553
  TopLayer w0.5: FB11.2@53.151,25.569 53.201,25.569 53.401,25.369 53.401,25.364 54.212,24.553 53.951,24.292 v2(53.951,23.989) ; v2(54.447,23.992) C108.2@54.447,24.296
VDDO_1/2: C123.2 C124.2 FB16.2 U5.20 | length 3.9
  TopLayer w0.3: v1(62.255,20.345) 62.479,20.345 62.874,19.95 C123.2@62.884,19.96 FB16.2@63.775,19.96
  TopLayer w0.5: C124.2@63.675,21.145 63.68,21.145 63.7,21.125 63.7,20.035 63.775,19.96 FB16.2@63.806,19.928
  Bottom Layer w0.25: U5.20@61.593,19.956 62.04,19.956 62.208,20.123 62.208,20.298 v1(62.255,20.345)
VDDO_3/4: C133.2 C134.2 FB18.2 U5.25 | length 4.2
  TopLayer w0.3: v1(62.289,17.94) 62.562,18.214 C133.2@62.884,18.214 FB18.2@63.725,18.214
  TopLayer w0.5: FB18.2@63.725,18.214 FB18.2@63.924,18.014 63.924,16.841 63.834,16.751 C134.2@63.829,16.751
  Bottom Layer w0.25: U5.25@61.593,17.456 62.109,17.456 62.241,17.588 62.241,17.892 v1(62.289,17.94)
VDDO_5: C145.2 C146.2 FB20.2 U5.28 | length 5.1
  TopLayer w0.25: C145.2@62.911,15.064 63.236,15.064
  TopLayer w0.5: v1(62.987,14.615) 63.236,14.864 ; 63.236,14.977 63.918,14.977 FB20.2@64.029,15.088 FB20.2@63.84,14.899 ; C146.2@63.722,13.824 FB20.2@63.722,14.899
  Bottom Layer w0.25: U5.28@61.593,15.956 62.172,15.956 62.862,15.266 62.862,14.808 62.987,14.683 v1(62.987,14.615)
VDDO_6: C119.2 C120.2 FB14.2 U5.43 | length 5.2
  TopLayer w0.25: FB14.2@51.547,15.657 51.725,15.836 C119.2@52.624,15.836 ; v1(52.277,16.216) 52.277,16.182 C119.2@52.624,15.836 ; v1(53.217,15.911) 53.149,15.911 53.073,15.836 C119.2@52.634,15.836 C119.2@52.624,15.836
  TopLayer w0.5: FB14.2@51.547,15.657 51.565,15.639 51.565,15.176 51.54,15.151 51.54,14.458 51.584,14.414
  Bottom Layer w0.25: v1(52.277,16.216) 52.911,16.216 v1(53.217,15.911) 53.257,15.951 53.788,15.951 U5.43@53.793,15.956
VDDO_7/8: C127.2 C128.2 FB17.2 U5.46 | length 4.1
  TopLayer w0.25: FB17.2@51.747,17.719 51.807,17.779 C127.2@52.719,17.779
  TopLayer w0.5: FB17.2@51.547,17.514 51.547,17.519 FB17.2@51.67,17.643 ; FB17.2@51.747,17.719 FB17.2@51.67,17.643 ; C128.2@51.908,18.718 51.908,18.668 51.67,18.43 FB17.2@51.67,17.643
  Bottom Layer w0.25: v1(52.281,17.719) 52.722,17.719 52.984,17.456 U5.46@53.793,17.456
VDDO_9/10: C137.2 C138.2 FB19.2 U5.51 | length 3.8
  TopLayer w0.5: FB19.2@51.5,20.009 51.7,20.209 51.7,20.72 51.764,20.784 ; C138.2@51.778,21.323 51.764,21.309 51.764,20.784 ; v1(53.128,20.14) 53.128,20.172 v1(52.488,20.811) 51.792,20.811 51.764,20.784
  Bottom Layer w0.25: v1(53.128,20.14) 53.195,20.14 53.379,19.956 U5.51@53.793,19.956
pads on no net: FID1.0 FID2.0 FID3.0 FID4.0 FID5.0 FID6.0 T1.2 T2.2 T3.2 T3.5 U3.6 U4_U_RF_ANT_L.2 U4_U_RF_ANT_L.6 U4_U_RF_ANT_L.8 U4_U_RF_ANT_L.9 U4_U_RF_ANT_L.10 U4_U_RF_ANT_M.2 U4_U_RF_ANT_M.6 U4_U_RF_ANT_M.8 U4_U_RF_ANT_M.9 U4_U_RF_ANT_M.10 U5. U5.1 U5.2 U5.3 U5.18 U5.19 U5.23 U5.24 U5.35 U5.36 U5.44 U5.45 U5.47 U5.48 U5.52 U5.53 U5.56 U6.27 U6.28 U6.33 U6.34 U7.7 U7.10 U7.15 U7.16 U8.4 U8.7 U8.10 U8.15 U14.8 U23.5 U23.14 U23.15 X1.2

## Polygon pours and split planes (outlines as drawn)
3V3_MB on TopLayer "3V3_MB_L01_P190" (solid, remove dead copper, pour order 190): 36.2,11.279 34.113,11.279 33.765,10.931 33.765,9.266 33.94,9.091 36.2,9.091
GND on TopLayer "GND_L01_P202" (solid, remove dead copper, pour order 202): 11.06,22.433 11.06,20.494 12.583,20.494 12.584,20.49 12.584,12.846 6.528,12.846 6.528,20.559 7.881,20.559 7.881,22.433
2122_VCC on TopLayer "2122_VCC_L01_P188" (solid, pour order 188): 28.49,24.101 28.48,24.111 28.48,25.677 28.778,25.975 30.421,25.975 30.707,25.7 30.707,24.32 30.488,24.101
3V6_DCDC on TopLayer "3V6_DCDC_L01_P193" (solid, remove dead copper, pour order 193): 11.815,24.752 13.053,23.504 13.053,21.973 12.685,21.605 12.685,14.768 12.785,14.668 19.437,14.668 19.437,15.809 20.658,15.809 20.723,15.744 21.123,16.144 21.123,17.609 21.404,17.889 22.4,17.889 22.4,19.494 19.468,19.494 15.69,23.272 15.69,29.141 16.834,30.285 20.002,30.285 21.895,32.178 21.895,36.928 18.583,36.928 18.583,36.679 18.786,36.487 18.786,32.574 18.521,32.308 14.608,32.308 11.815,29.516
SPI_1V8_ADC on TopLayer "SPI_1V8_ADC_L01_P185" (solid, remove dead copper, pour order 185): 27.152,19.602 29.348,21.799 29.348,22.136 29.348,23.644 29.348,23.96 29.575,24.186 31.876,24.186 32.5,23.562 32.5,19.707 30.038,17.245 29.019,17.25 cw(c28.925,18.21) 28.925,17.245 25.379,17.245 ccw(c25.379,17.041) 25.174,17.041 25.174,16.044 cw(c24.793,16.044) 24.793,15.663 24.387,15.663 cw(c24.387,16.027) 24.023,16.027 24.023,17.334 ccw(c23.748,17.334) 23.748,17.609 22.817,17.609 cw(c22.817,17.973) 22.453,17.973 22.453,19.602
SPI_1V8_CLK on TopLayer "SPI_1V8_CLK_L01_P057" (solid, remove dead copper, pour order 57): 39.465,12.515 41.395,12.506 41.395,11.043 39.465,11.043
12V on TopLayer "12V_L01_P192" (solid, remove dead copper, pour order 192): 5.834,24.333 5.857,21.204 6.285,20.776 6.285,12.574 7.79,11.069 15.841,11.084 16.389,10.536 16.389,8.865 4.688,8.865 3.209,10.344 3.209,16.772 2.689,17.274 2.689,24.333
PGND on TopLayer "PGND_L01_P200" (solid, remove dead copper, pour order 200): 16.389,4.265 16.389,4.697 17.007,5.315 24.584,5.315 24.584,2.59 22.413,2.59 21.706,3.298 0.335,3.298 0.025,3.607 0.025,18.772 2.55,18.772 2.55,17.119 3.161,16.509 3.161,8.975 3.761,8.375 4.903,8.375 4.903,4.551 5.189,4.265
3V3_MB on TopLayer "3V3_MB_L01_P041" (solid, remove dead copper, pour order 41): 41.393,10.881 39.429,10.881 39.063,10.515 39.063,9.584 39.258,9.389 41.506,9.389 41.595,9.479 41.595,10.679
4610_FINE_3V3 on TopLayer "4610_FINE_3V3_L01_P040" (solid, remove dead copper, pour order 40): 56.424,39.736 59.648,39.736 59.648,35.87 56.424,35.87
4610_FINE_3V3 on TopLayer "4610_FINE_3V3_L01_P076" (solid, pour order 76): 27.298,38.094 27.425,37.967 27.425,34.803 27.238,34.616 26.383,34.62 cw(c26.294,35.516) 26.294,34.616 25.174,34.616 cw(c25.174,34.838) 24.952,34.838 24.952,36.08 cw(c25.103,36.08) 25.103,36.231 ccw(c25.103,36.331) 25.174,36.26 ccw(c25.174,36.433) 25.346,36.433 25.346,38.094
GND_VCXO on TopLayer "GND_VCXO_L01_P056" (solid, remove dead copper, pour order 56): 51.373,50.23 51.553,50.41 53.909,50.41 54.462,50.41 54.561,50.41 54.616,50.355 54.616,49.247 54.559,49.19 53.986,49.19 53.986,47.006 54.129,46.863 60.439,46.863 61.158,46.144 61.158,41.301 60.65,40.792 58.396,40.792 58.248,40.941 58.248,42.529 58.373,42.529 58.673,42.829 58.673,45.4 51.793,45.4 51.373,45.82
2122_VCC on TopLayer "2122_VCC_L01_P052" (solid, remove dead copper, pour order 52): 33.255,32.858 33.649,32.463 33.644,31.282 33.892,31.035 35.387,31.035 36.067,31.716 36.067,32.37 36.967,32.37 36.967,33.828 34.372,33.828 33.255,33.828
SPI_1V8_CLK on TopLayer "SPI_1V8_CLK_L01_P048" (solid, pour order 48): 25.046,30.091 24.995,30.142 24.995,33.697 cw(c25.217,33.697) 25.217,33.919 26.338,33.919 cw(c26.338,33.019) 27.238,33.019 27.238,30.456 26.873,30.091
GND on Layer 1 "GND_L02_P177" (solid, remove dead copper, pour order 177): 70,3.2 70,83.2 0,83.2 0,3.2
PGND on Layer 1 "PGND_L02_P172" (solid, remove dead copper, pour order 172): 6.05,34.925 0.178,34.925 0.178,3.734 0.686,3.226 22.25,3.226 22.276,3.2 24.46,3.2 24.46,5.659 22.834,7.285 17.185,12.934 6.05,12.934
4610_FINE_3V3 on Layer 2 "4610_FINE_3V3_L03_P087" (solid, pour order 87): 59.023,27.372 59.023,22.084 58.022,21.083 58.022,12.642 55.807,10.431 cw(c55.377,10.943) 55.384,10.275 53.157,10.275 cw(c53.157,10.625) 52.807,10.625 52.807,12.802 cw(c52.934,12.802) 52.934,12.929 ccw(c52.934,13.03) 53.035,13.03 53.035,25.07 ccw(c52.527,25.07) 52.527,25.578 51.785,25.578 cw(c51.785,25.928) 51.435,25.928 51.437,26.163 cw(c51.562,26.187) 51.435,26.187 51.435,27.915 cw(c52.213,27.915) 52.213,28.692 57.566,28.692 cw(c57.566,27.229)
2122_VCC on Layer 2 "2122_VCC_L03_P079" (solid, pour order 79): 30.534,26.013 ccw(c30.534,27.719) 32.24,27.719 32.24,33.661 cw(c33.905,33.658) 33.907,35.323 cw(c33.996,34.42) 33.996,35.328 44.761,35.328 cw(c44.761,34.699) 45.39,34.699 45.39,25.645 cw(c44.564,25.645) 44.564,24.819 42.669,24.819 cw(c42.669,26.058) 41.431,26.058 41.431,30.74 ccw(c40.619,30.74) 40.619,31.552 35.509,31.552 ccw(c35.509,30.965) 34.922,30.965 34.922,24.359 cw(c34.439,24.359) 34.439,23.876 30.886,23.876 cw(c30.886,24.994) 30.777,23.881 ccw(c30.57,23.878) 30.567,24.085 28.593,24.085 cw(c28.593,24.358) 28.321,24.358 28.321,25.298 cw(c29.035,25.298) 29.035,26.013
2122_0VDD on Layer 2 "2122_0VDD_L03_P095" (solid, pour order 95): 33.368,23.559 34.566,23.559 ccw(c34.566,24.017) 35.024,24.017 35.024,25.067 cw(c35.677,25.067) 35.677,25.719 36.692,25.719 cw(c36.692,25.429) 36.982,25.429 36.982,24.142 cw(c34.442,24.142) 34.442,21.602 33.572,21.602 cw(c33.572,21.806) 33.368,21.806
no net on Layer 2 "NONET_L03_P093" (solid, pour order 93): 29.362,24.232
no net on Layer 2 "NONET_L03_P058" (solid, pour order 58): 24.765,28.905
SPI_1V8_CLK on Layer 3 "SPI_1V8_CLK_L04_P078" (solid, remove dead copper, pour order 78): 50.739,33.699 49.772,34.666 25.114,34.666 24.59,34.142 24.59,30.931 25.119,30.402 ccw(c25.298,30.582) 25.298,30.328 28.448,30.328 cw(c28.449,27.814) 28.593,30.323 42.647,30.323 cw(c42.647,27.783) 45.187,27.783 45.186,21.336 cw(c42.823,21.287) 45.187,21.285 45.187,16.216 45.187,10.208 ccw(c47.727,10.208) 47.727,7.668 64.694,7.668 ccw(c64.694,10.208) 67.234,10.208 67.234,12.548 ccw(c67.208,12.548) 67.208,12.573 67.208,20.98 ccw(c66.472,20.98) 66.472,21.717 64.789,21.717 ccw(c64.789,21.292) 64.364,21.292 64.364,13.411 cw(c63.348,13.411) 63.348,12.395 54.625,12.395 53.279,12.395 cw(c53.279,14.935) 50.739,14.935
4610_FINE_3V3 on Layer 3 "4610_FINE_3V3_L04_P089" (solid, pour order 89): 20.106,29.58 cw(c20.106,30.986) 18.7,30.986 18.7,38.319 cw(c20.267,38.319) 20.267,39.886 59.912,39.886 cw(c59.912,37.346) 62.452,37.346 62.452,35.459 62.446,34.749 cw(c59.919,34.5) 62.459,34.5 62.459,27.33 cw(c61.265,27.33) 61.265,26.137 55.202,26.137 cw(c55.202,28.677) 52.662,28.677 52.662,33.165 ccw(c51.069,33.165) 51.069,34.758 25.247,34.758 ccw(c25.247,32.218) 22.707,32.218 22.707,30.011 cw(c22.276,30.011) 22.276,29.58
2122_0VDD on Layer 3 "2122_0VDD_L04_P120" (solid, remove dead copper, pour order 120): 35.166,25.753 35.166,23.965 35.403,23.728 42.177,23.728 42.255,23.806 42.255,25.685 42.067,25.873 39.581,25.873 35.286,25.873
no net on Layer 3 "NONET_L04_P083" (solid, pour order 83): 51.486,25.425
no net on Layer 3 "NONET_L04_P082" (solid, pour order 82): 51.79,27.965
2122_VCC on Bottom Layer "2122_VCC_L06_P097" (solid, pour order 97): 44.104,25.742 43.929,25.567 41.603,25.567 41.504,25.666 41.504,26.792 44.038,26.792 44.104,26.727
NetC185_U_ATT2_1 on Bottom Layer "NETC185_U_ATT2_1_L06_P203" (solid, remove dead copper, pour order 203): 47.438,69.85 ccw(c47,69.85) 47,70.288 cw(c47,70.431) 46.858,70.431 46.858,71.126 ccw(c46.645,71.126) 46.645,71.338 45.477,71.338 ccw(c45.477,70.665) 44.804,70.665 44.804,68.547 ccw(c45.082,68.547) 45.082,68.269 47.137,68.269 ccw(c47.137,68.57) 47.438,68.57
NetC185_U_ATT1_1 on Bottom Layer "NETC185_U_ATT1_1_L06_P168" (solid, remove dead copper, pour order 168): 24.152,65.189 24.385,64.956 24.611,64.956 24.797,64.771 24.797,64.028 24.963,63.862 25.9,63.862 26.452,64.414 26.452,65.371 26.452,66.371 ccw(c26.346,66.371) 26.346,66.477 25.696,66.477 ccw(c25.696,66.433) 25.652,66.433 25.652,66.371 cw(c25.302,66.371) 25.302,66.021 24.302,66.021 ccw(c24.302,65.871) 24.152,65.871
PGND on Bottom Layer "PGND_L06_P045" (solid, remove dead copper, pour order 45): 17.957,5.61 18.992,4.575 24.274,4.575 24.274,6.915 23.26,7.929 19.788,7.929 19.045,8.672 19.045,12.762 4.872,12.762 4.315,13.32 4.315,30.835 3.396,31.754 0.33,31.754 0.33,31.706 0.254,31.63 0.254,3.861 0.584,3.531 4.039,3.531 4.115,3.607 4.115,5.41 4.315,5.61
3V3_MB on Bottom Layer "3V3_MB_L06_P073" (solid, remove dead copper, pour order 73): 22.249,13.237 22.384,13.372 23.669,13.372 23.669,12.888 23.569,12.788 22.343,12.788 22.249,12.881
VDD_CORE on Bottom Layer "VDD_CORE_L06_P107" (solid, pour order 107): 59.888,25.477 59.888,24.631 59.563,24.306 59.16,24.287 58.504,24.287 ccw(c58.504,23.845) 58.063,23.845 58.063,22.806 57.823,22.806 57.823,24.306 59.122,25.606 59.442,25.602 59.763,25.602
+12 on Bottom Layer "+12_L06_P183" (solid, remove dead copper, pour order 183): 24.7,2.75 24.7,5.184 24.274,5.61 5.113,5.61 4.642,5.139 4.642,3.384 4.724,3.302 20.701,3.302 21.817,3.302 22.158,2.75
3V3_DIGIT on Bottom Layer "3V3_DIGIT_L06_P184" (solid, remove dead copper, pour order 184): 18.627,12.602 18.627,13.742 20.625,13.742 20.774,13.593 22.249,13.593 22.249,12.881 19.56,12.881 19.281,12.602
VDDO_1/2 on Bottom Layer "VDDO_1/2_L06_P106" (solid, pour order 106): 64.024,20.974 64.321,20.677 64.321,19.981 64.175,19.841 cw(c64.126,20.084) 64.126,19.836 61.293,19.836 61.293,20.356 61.91,20.974
VDDO_3/4 on Bottom Layer "VDDO_3/4_L06_P103" (solid, pour order 103): 61.293,17.576 62.23,18.514 64.333,18.514 64.449,18.397 64.449,17.786 64.291,17.628 63.623,17.628 ccw(c63.623,17.456) 63.452,17.456 cw(c63.272,17.456) 63.272,17.276 61.353,17.276 cw(c61.353,17.336) 61.293,17.336
2122_VCC on Bottom Layer "2122_VCC_L06_P101" (solid, pour order 101): 34.963,33.774 cw(c34.963,33.394) 35.343,33.394 ccw(c35.613,33.394) 35.613,33.124 35.623,33.124 cw(c35.623,32.505) 36.242,32.505 36.242,32.031 cw(c35.263,32.031) 35.263,31.052 34.07,31.052 cw(c34.07,31.455) 33.666,31.455 33.666,32.476 33.671,32.476 33.671,32.552 ccw(c33.481,32.552) 33.481,32.742 cw(c33.481,32.946) 33.276,32.946 33.276,33.841 ccw(c33.343,33.841) 33.343,33.774
VDD_PLL2OSC on Bottom Layer "VDD_PLL2OSC_L06_P077" (solid, remove dead copper, pour order 77): 53.603,24.561 55.193,24.561 55.663,24.091 55.894,24.091 56.063,23.922 56.063,22.806 55.823,22.806 55.823,23.427 55.643,23.606 53.603,23.606
2122_VCC on Bottom Layer "2122_VCC_L06_P167" (solid, remove dead copper, pour order 167): 35.217,26.567 35.145,26.64 33.896,26.64 33.782,26.526 33.782,25.243 33.782,24.176 34.987,24.176 35.094,24.283 35.094,25.653 35.167,25.726 35.505,25.726 35.567,25.789 35.567,26.442 ccw(c35.442,26.442) 35.442,26.567
2122_VCC on Bottom Layer "2122_VCC_L06_P099" (solid, pour order 99): 41.993,33.857 cw(c42.119,33.857) 42.119,33.983 42.814,33.983 cw(c42.811,33.665) 43.129,33.663 43.129,32.374 ccw(c43.289,32.374) 43.289,32.214 cw(c43.289,32.06) 43.443,32.06 43.443,31.317 cw(c43.193,31.317) 43.193,31.067 41.706,31.067 cw(c41.706,31.531) 41.242,31.531 41.242,32.119 ccw(c40.956,32.119) 41.237,32.175 41.237,33.062 cw(c41.378,33.062) 41.378,33.203 41.456,33.203 ccw(c41.456,33.74) 41.993,33.74
no net on Bottom Layer "NONET_L06_P199" (solid, remove dead copper, pour order 199): 56.823,15.606
no net on Bottom Layer "NONET_L06_P186" (solid, remove dead copper, pour order 186): 8.017,80.432
GND on Layer 4 "GND_L05_P170" (solid, remove dead copper, pour order 170): 5.45,12.254 6.317,11.387 13.201,11.387 15.117,9.471 20.704,9.471 24.917,5.257 24.917,2.54 30.023,2.54 30.29,2.808 30.29,3.925 30.531,4.166 31.674,4.166 31.977,3.862 31.977,2.922 32.334,2.565 47.219,2.565 47.853,3.2 70,3.2 70,43.072 62.631,43.072 8.248,43.072 5.45,40.273
GND_ATT_U_ATT1 on Layer 4 "GND_ATT_U_ATT1_L05_P173" (solid, remove dead copper, pour order 173): 7.478,51.48 7.478,43.282 40.344,43.282 70,43.282 70,83.2 0,83.2 0,55.3 7.47,55.3
PGND on Layer 4 "PGND_L05_P174" (solid, remove dead copper, pour order 174): 7.087,70.028 7.087,42.495 5.928,41.336 5.928,12.865 6.082,12.711 17.018,12.711 20.472,9.257 24.917,4.808 24.917,2.54 22.839,2.54 22.179,3.2 0,3.2 0,70.028
no net on Layer 4 "NONET_L05_P201" (solid, remove dead copper, pour order 201): 33.985,43.282

## Keep-outs
KeepOutLayer:
  lines w0.1: 0,3.2 0,83.2 70,83.2 70,3.2 48.651,3.2 ccw(c48.651,2.399) 47.85,2.399 47.85,0 31.9,0 31.9,3.2 31.9,3.241 ccw(c31.148,3.241) 31.148,3.994 ccw(c31.148,3.246) 30.4,3.246 30.4,0 22.5,0 22.15,0 22.15,2.388 ccw(c21.338,2.388) 21.338,3.2 0,3.2

## Other copper
TopLayer:
  pour cut-out: 28.678,17.141 26.934,17.141 26.467,16.674 26.55,16.591 26.55,14.767 24.576,14.767 22.883,13.074 22.883,12.713 21.923,12.713 21.713,12.923 21.713,13.236 20.464,14.485 19.222,14.485 19.074,14.337 19.074,13.343 19.5,12.917 20.375,12.917 20.375,9.391 21.255,8.51 24.069,8.51 24.737,7.842 26.311,7.842 27.196,6.957 30.797,6.957 30.797,10.847 30.656,10.988 31,11.333 32.856,11.333 33.327,11.804 33.327,12.312 32.439,13.2 28.954,13.2 28.954,16.89 28.866,16.977
  pour cut-out: 46,33 47.887,33 48.989,34.102 52.789,34.102 52.789,42.156 51.21,43.735 51.21,50.2 51.85,50.84 59.869,50.84 59.869,52.374 59.894,52.399 46.598,52.399 46.006,51.807 46.006,33.008
  pour cut-out: 47.701,21.031 47.709,21.024 48.88,21.024 48.88,13.488 47.662,13.488 47.569,13.581 47.569,20.891 47.702,21.024
  pour cut-out: 33.759,27.077 35.284,27.077 35.284,26.101 35.992,25.394 36.545,25.394 36.852,25.087 36.852,23.967 33.295,23.967 33.049,24.213 33.049,24.842 33.759,25.552
  pour cut-out: 29.375,29.165 29.463,29.078 29.463,26.715 29.332,26.584 26.821,26.584 26.71,26.694 26.719,26.704 26.719,28.93 26.955,29.165
  pour cut-out: 41.722,25.178 41.954,25.178 43.159,25.178 43.159,21.961 43.17,21.95 42.69,21.47 41.822,21.47
  pour cut-out: 62.977,52.107 63.854,52.107 63.926,52.18 63.926,51.48 62.977,51.48
  pour cut-out: 60.094,52.114 60.1,52.107 61.044,52.107 61.044,51.48 60.094,51.48
  pour cut-out: 62.979,55.215 63.929,55.215 63.929,54.515 63.057,54.515 62.979,54.594
  pour cut-out: 60.081,55.215 61.031,55.215 61.031,54.594 60.111,54.594 60.081,54.564
  pour cut-out: 59.562,31.437 60.636,31.437 60.68,31.393 60.68,30.905 60.512,30.737 59.562,30.737
  pour cut-out: 59.562,34.443 60.512,34.443 60.512,34.011 60.68,33.843 60.58,33.743 59.562,33.743
  pour cut-out: 55.038,38.258 55.761,38.258 55.888,38.132 55.888,37.308 55.295,37.308 55.253,37.266 55.038,37.482
  pour cut-out: 52.047,38.258 52.897,38.258 52.897,37.073 52.662,37.308 52.047,37.308
  pour cut-out: 31.217,6.756 31.217,7.405 31.545,7.733 32.065,7.733 32.535,8.203 32.535,10.495 32.953,10.913 33.54,10.913 33.603,10.85 33.603,9.224 33.898,8.929 35.306,8.929 35.608,8.627 35.608,7.08 35.272,6.744 32.724,6.744
  pour cut-out: 37.719,10.16 37.73,10.171 39.009,10.171 39.009,9.581 39.381,9.209 41.3,9.209 41.594,8.914 41.594,7.268 41.3,6.974 37.993,6.974 37.55,7.418 37.55,9.989 37.731,10.171
  pour cut-out: 43.358,18.517 42.073,18.517 37.012,13.456 37.012,12.749 37.512,12.249 37.512,10.967 37.82,10.659 38.982,10.659 39.321,10.999 39.303,11.017 39.303,12.352 39.624,12.674 40.89,12.674 41.441,13.224 41.441,16.153 43.348,18.061 43.348,18.506
  pour cut-out: 4.229,32.692 5.666,32.692 6.05,32.308 6.05,25.964 8.226,24.639 4.229,24.639
  pour cut-out: 18.842,30.285 22.797,30.285 22.884,30.198 22.884,28.675 22.439,28.229 22.175,28.229 22.175,27.294 22.06,27.179 20.75,27.179 20.464,27.465 20.464,27.666 18.842,29.288
  pour cut-out: 15.757,25.857 21.981,25.857 22.21,25.628 22.21,21.619 22.978,20.851 22.978,19.869 22.711,19.602 19.345,19.602 15.757,23.191